# Altium PCB PDBMCU.PcbDoc (part 2 of 3)
Units mil, origin at the board's own origin, x right, y up, seen from the top; angles counter-clockwise.
Board outline 5245 x 4685 mil, 4 copper layers (Top Layer, Second Layer, Third Layer, Bottom Layer), stack 60.674 mil thick; 139 components, 73 nets, 640 pads, 472 vias.
Unrouted connection lines stored in the file: 2.
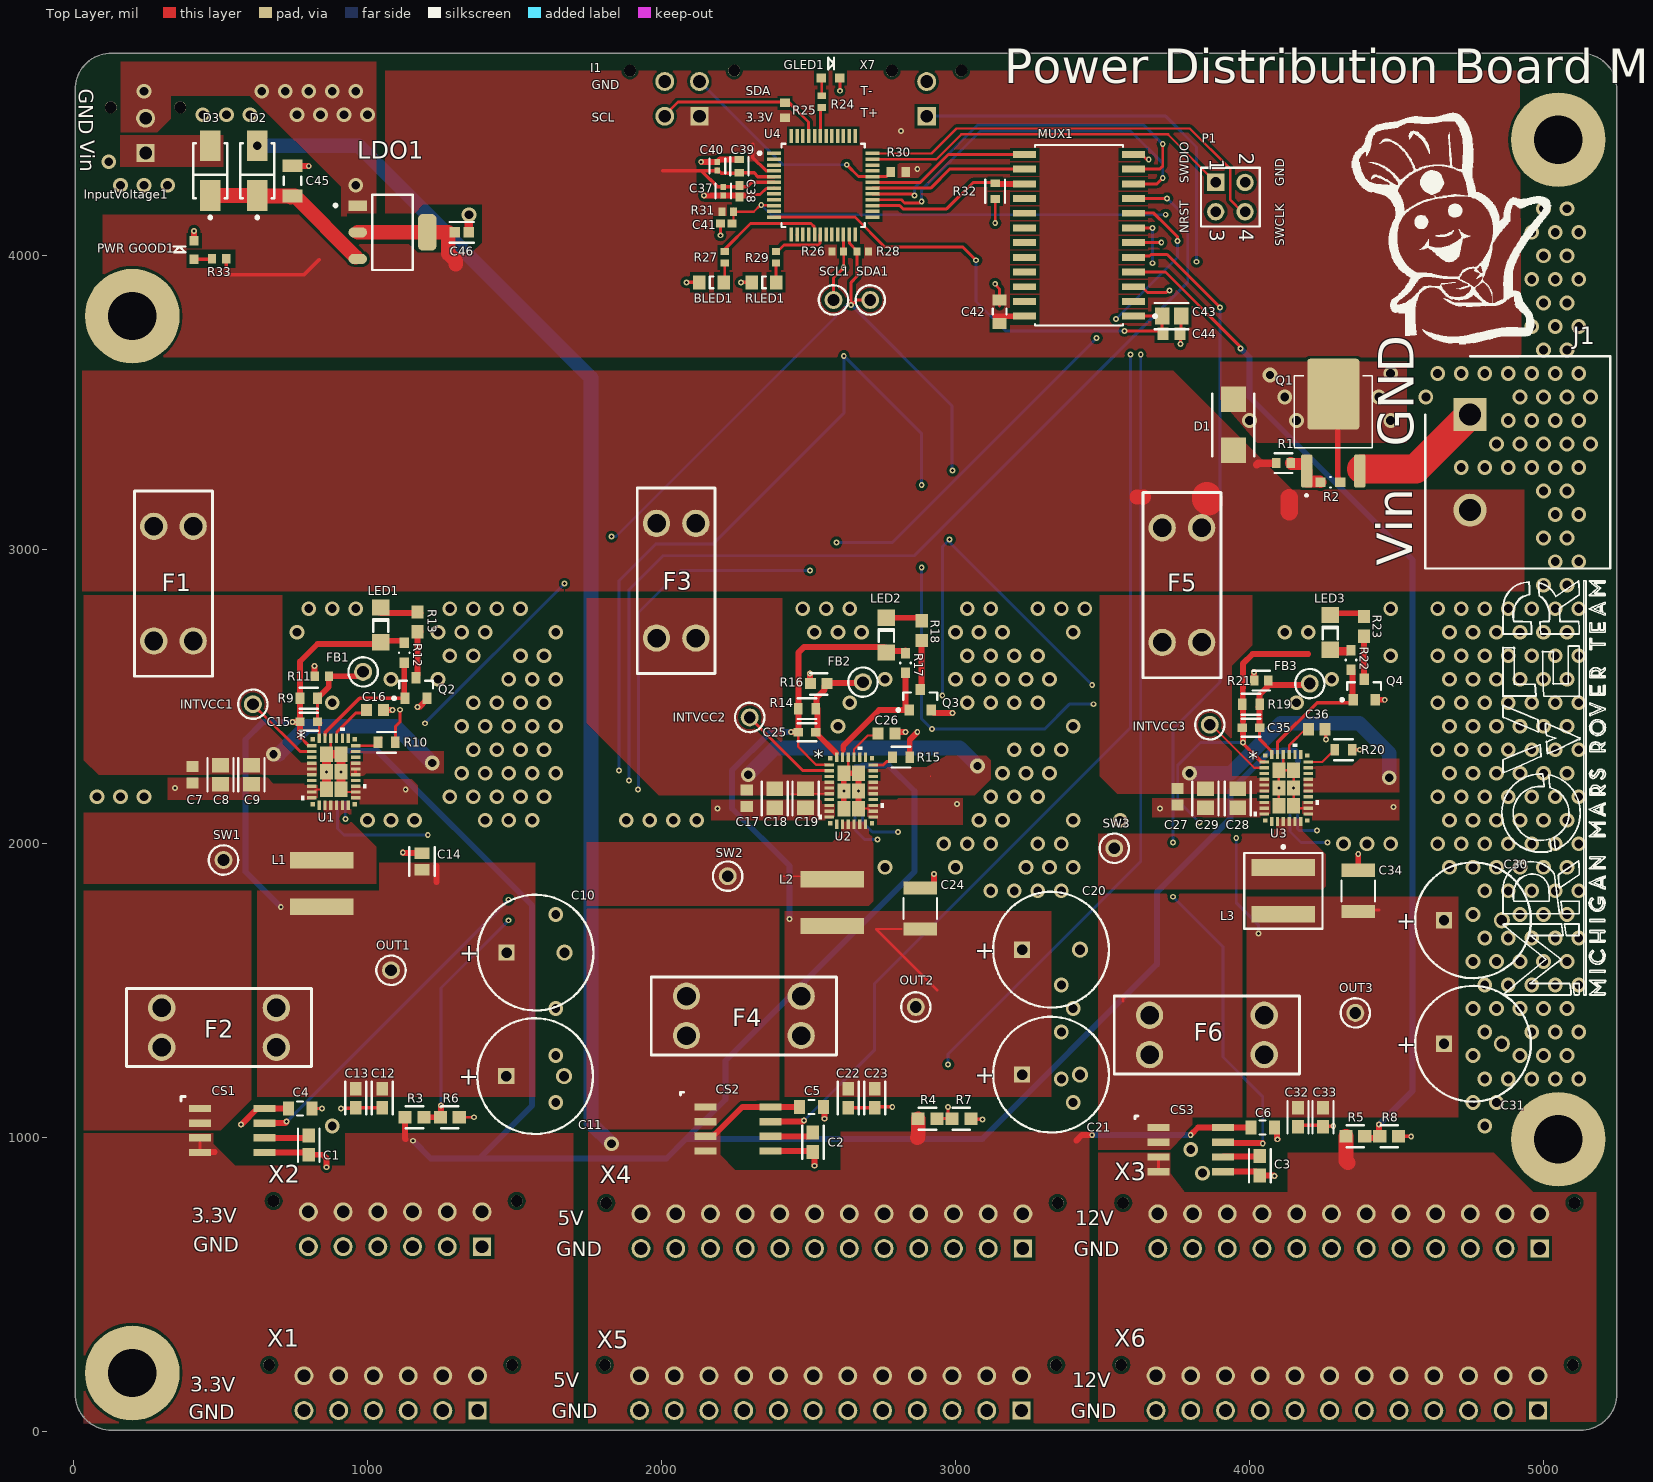
[diagram p0: Top Layer view]

## Part data (continued)
R32: library part CMP-2100-03664-2, "RES 10K OHM 1% 1/10W 0603", Case Code (Imperial)=0603, Case Code (Metric)=1608, Max Operating Temperature=155°C, Max Power Dissipation=100mW, Min Operating Temperature=-55°C, Resistance=10kR, Resistance Tolerance=1%, Resistor Type="Thick Film", Temperature Coefficient=100ppm/°C, Voltage Rating=75V, Voltage Rating (DC)=50V, Case/Package=0603, Construction=Rectangular, Depth=0.8mm, Features="Moisture Resistant", Height=0.45mm, Lead Free="Lead Free", Lead Pitch=0.3mm, Length=1.6mm, Military Standard=Not, Number of Pins=2, Number of Terminations=2, Packaging="Tape and Reel", Power Rating=100mW, RoHS Compliant=Yes, Series=RC, Size Code=0603, Termination=SMD/SMT, Tolerance=1%, Weight=7.1E-05oz, Width=0.8mm
R33: library part CMP-2000-00713-1, Manufacturer=Panasonic, Part Number=ERJ-3GEYJ121V
RLED1: library part CMP-1426-00011-1, "SMD mono-color Chip LED, WL-SMCW, Red", Color=Red, Manufacturer="Wuerth Elektronik", ComponentLink1Description="Manufacturer URL", ComponentLink1URL=http://www.we-online.com, ComponentLink2Description=Datasheet, ComponentLink2URL=http://katalog.we-online.com/led/datasheet/150080RS75000.pdf, PackageReference=0805_A, PartNumber=150080RS75000
Temp1 Temp2 Temp3: library part CMP-0192-00343-2, "SENSOR DIGITAL -40C-125C 8MSOP", Case/Package=MSOP, Max Operating Temperature=125°C, Max Supply Voltage=5.5V, Min Operating Temperature=-40°C, Min Supply Voltage=2.7V, Operating Supply Current=200uA, Package Quantity=2500, Height=0.95mm, Interface=I2C, Lead Free="Lead Free", Length=3mm, Max Supply Voltage (DC)=5.5V, Min Supply Voltage (DC)=2.7V, Number of Pins=8, Output Type=Digital, Packaging="Tape and Reel", Radiation Hardening=No, Resolution=10b, Width=3mm
U1 U2 U3: "No Description Available", Copyright="Copyright (C) 2018 Accelerated Designs. All rights reserved", RefDes=RefDes, Type=DEV
U4: library part CMP-12105-000052-1, "IC MCU 32BIT 128KB FLASH 48LQFP", Ambient Temperature Range High=+85°C, Ambient Temperature Range Low=-40°C, Frequency=64MHz, Manufacturer=STMicroelectronics, Manufacturer Part Number=STM32G071CBT6, Max Junction Temp=+105°C, Max Supply Voltage=3.6V, Min Supply Voltage=1.55V, Package=LQFP48-5B, Temperature="-40°C to +85°C", Automotive=No, Category=IC, ComponentLink2Description=Datasheet, ComponentLink2URL=https://www.st.com/resource/en/datasheet/stm32g071cb.pdf, Core Architecture="ARM Cortex-M0+", Data Bus Width=32bits, Device Class L1="Integrated Circuits (ICs)", Device Class L2="Embedded Processors and Controllers", Device Class L3=Microcontrollers, Digikey Description="IC MCU 32BIT 128KB FLASH 48LQFP", Height=1.6mm, Interface=I2C,SPI,UART,USART,USB,LIN,IrDA,I2S,Other, Lead Free=Yes, Memory Size=128KBytes, Memory Type=FLASH, Number Of A/D Converters=1, Number Of Adc Channels=17, Number Of Cores=1, Number Of I2C Channels=2, Number Of I/Os=44, Number Of Spi Channels=2, Number Of Timers/Counters=12, Number Of Uart Channels=5, Number Of Usb Channels=2, Octopart=https://octopart.com/stm32g071cbt6-stmicroelectronics-96627027, Ram Size=36KBytes, RoHS=TRUE, Standoff Height=0.05mm, Temperature Range High=+85°C, Temperature Range Low=-40°C
X1 X2: library part HEADER_POS12_?44914-1201, Package=44914-1201, DeviceName=44914-1201, DeviceSetName=HEADER_POS12_?, GateName_1=G$1, LibraryName=con-molex-micro-fit-3_0_2, SymbolName_1=HEADER_POS12
X3 X4 X5 X6: library part HEADER_POS24_?44914-2401, Package=44914-2401, DeviceName=44914-2401, DeviceSetName=HEADER_POS24_?, GateName_1=G$1, LibraryName=con-molex-micro-fit-3_0_2, SymbolName_1=HEADER_POS24

## Free pads (board coordinates)
  round 322 hole 164: ""(200,200) ""(200,3795) ""(5050,995) ""(5050,4395)

## Via types
v1: diameter 50, hole 30, Top Layer to Bottom Layer, tented both sides, 342 vias
v2: diameter 20, hole 10, Top Layer to Bottom Layer, tented both sides, 123 vias
v3: diameter 50, hole 28, Top Layer to Bottom Layer, tented both sides, 7 vias

## Nets (pads, with @x,y where several pads share a name; then routed paths per layer and width w, separated by ;. In a path a pad name is that pad's centre, name@x,y a point inside that pad or via, vN(x,y) a via of type N, cw(c..) or ccw(c..) an arc to the next point about the centre after c; other vN are vias at no path point)
3.3V: CS1.3 CS1.4 R3.2 Temp1.8 Temp2.7 Temp2.8 Temp3.6 Temp3.8 X1.P$7 X1.P$8 X1.P$9 X1.P$10 X1.P$11 X1.P$12 X2.P$7 X2.P$8 X2.P$9 X2.P$10 X2.P$11 X2.P$12 | length 7596.2
  Top Layer w10: CS1.4@429.76,950 CS1.3@429.76,1000
  Top Layer w20: CS1.4@429.76,950 431.69,951.92 480.5,951.92 ; R3.2@1127.9,1075 R3.2@1127.9,1070 1127.9,997.1 1130,995
  Bottom Layer w10: Temp2.7@2657.8,2266.61 Temp2.8@2683.39,2266.61 ; Temp3.6@4112.2,2271.61 4112.2,2318.16
  Bottom Layer w20: Temp1.8@930,2316.61 1033.39,2316.61 1560,1790 1560,1110 1380,930 ; v2(1155,990) 1215,930 1380,930 ; Temp2.8@2683.39,2266.61 2773.39,2266.61 2860.51,2179.49 2860.51,1905.51 2483.5,1528.5 2482.45,1528.5 2443.5,1489.55 2443.5,1488.5 2217.39,1262.39 2217.39,1130.36 2083.51,996.49 ; Temp3.8@4164.65,2280.35 4164.65,2307.61 4154.11,2318.16 4112.2,2318.16 4110.2,2316.16 4071.13,2316.16 3935,2180.03 3935,2085 3685,1835 3685,1590 3091.49,996.49 2083.51,996.49 ; 1380,930 2017.03,930 2083.51,996.49
3v3: C37.1 C38.2 C39.1 C40.1 C42.2 C46.1 I1.P$1 LDO1.2 LDO1.4 MUX1.24 R25.1 R26.2 R28.2 R30.1 R31.1 R33.1 U4.4 U4.5 U4.6 | length 1884.5
  Top Layer w12: R33.1@519.21,3995 519.21,3942.03 526.24,3935 783.64,3935 835,3986.36 ; LDO1.2@958.76,4080 LDO1.2@966.89,4080 ; 2005,4290 2030,4290 2030.1,4290.1 2135,4290.1 ; C40.1@2190,4294.24 C40.1@2190,4290.1 ; 2240,4234.9 C37.1@2210,4234.9 2190.19,4234.9 2135,4290.1 ; 2240.02,4234.93 2291.42,4234.93 2306.34,4249.84 U4.6@2382.68,4249.84 ; C39.1@2262.36,4281.06 2203.19,4281.06 2198.3,4285.95 2193.3,4285.95 2190,4289.25 C40.1@2190,4290.1 ; C39.1@2265,4282.36 2315,4282.36 2327.83,4269.53 U4.5@2382.68,4269.53 ; 2310.79,4380 2310.79,4334.28 2354.08,4290.99 2354.8,4290.99 2356.58,4289.21 ; 2135,4290.1 C40.1@2190,4290.1
  Top Layer w20: 3135,3794.49 3135.26,3794.74 3234.7,3794.74 MUX1.24@3234.96,3795 MUX1.24@3262.52,3795
  Top Layer w50: LDO1.2@966.89,4080 LDO1.4@1203.11,4080 1275,4080 1275,4008.11 1300,3983.11 1300,3971.15
  Third Layer w10: v2(2815,4425) 2815,4350 v2(2870,4295)